# Altium PCB Kasli-DIOT.PCBDOC (part 21 of 23)
Units mm, origin at the board's own origin, x right, y up, seen from the top; angles counter-clockwise.
Board outline 222.9 x 100 mm, 10 copper layers (TopLayer, Layer 2, Layer 3, Layer 4, Layer 5, Layer 6, Layer 7, layer 8, Layer 9, BottomLayer), stack 1.564 mm thick; 977 components, 900 nets, 4676 pads, 2725 vias.
Unrouted connection lines stored in the file: 17.
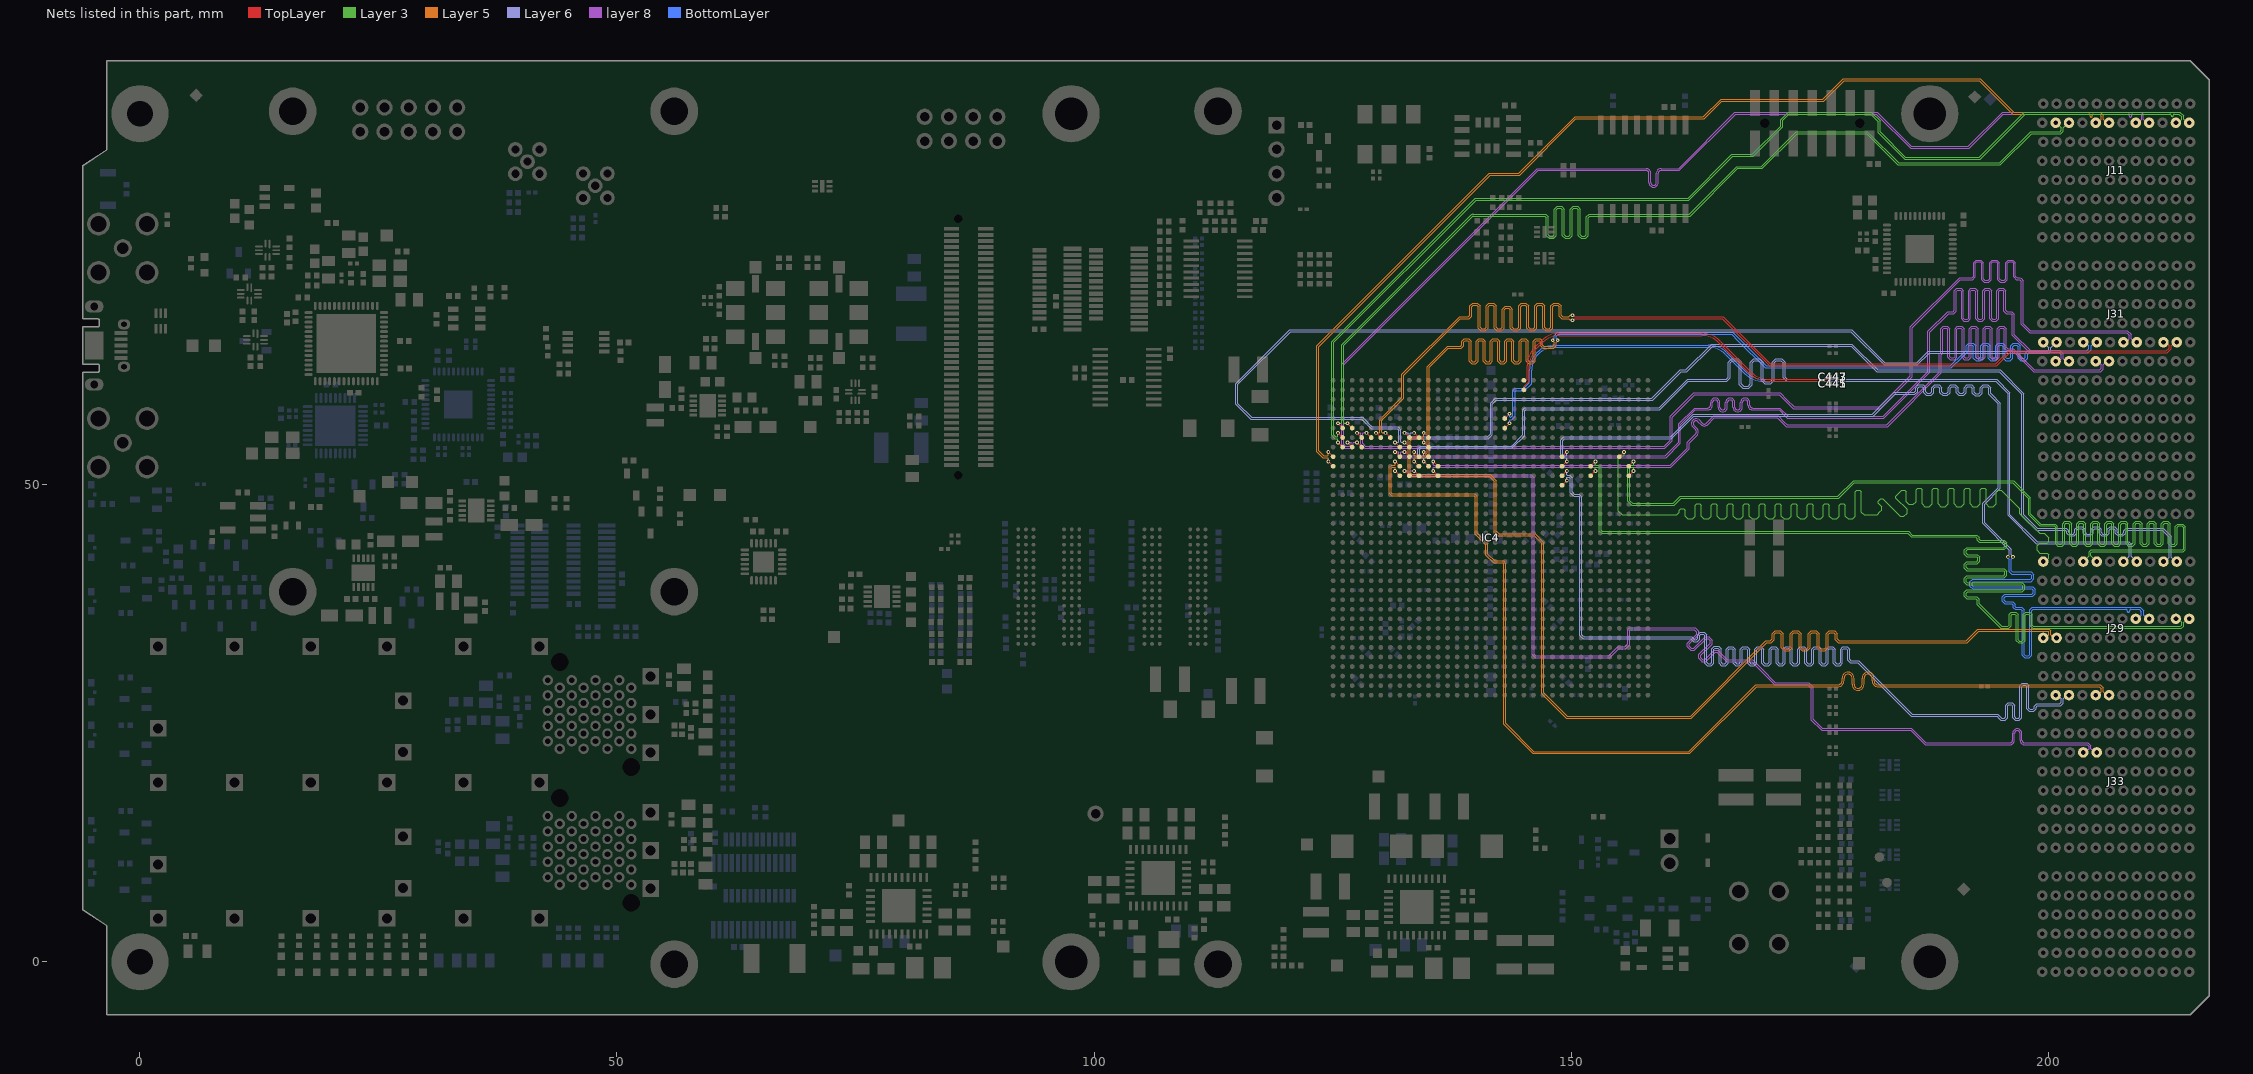
[diagram p27: the nets of this part, all layers, seen from the top]

## Via types
v1: diameter 0.4, hole 0.2, TopLayer to BottomLayer, tented both sides, 1723 vias
v2: diameter 0.5, hole 0.2, TopLayer to BottomLayer, tented both sides, 524 vias
v3: diameter 0.6, hole 0.3, TopLayer to BottomLayer, tented both sides, 172 vias
v4: diameter 0.6, hole 0.3, TopLayer to BottomLayer, 113 vias
v5: diameter 0.5, hole 0.2, TopLayer to BottomLayer, 107 vias
v6: diameter 0.4, hole 0.2, TopLayer to BottomLayer, 67 vias
v7: diameter 0.5, hole 0.25, TopLayer to BottomLayer, tented both sides, 12 vias
v8: diameter 0.8, hole 0.5, TopLayer to BottomLayer, tented both sides, 7 vias

## Nets (pads, with @x,y where several pads share a name; then routed paths per layer and width w, separated by ;. In a path a pad name is that pad's centre, name@x,y a point inside that pad or via, vN(x,y) a via of type N, cw(c..) or ccw(c..) an arc to the next point about the centre after c; other vN are vias at no path point) (continued)
SLOT7.LVDS_1_N: IC4.G11 J29.L4 | length 112.5
  TopLayer w0.095: v1(134.561,55.45) IC4.G11@135.061,54.95
  Layer 5 w0.08: v1(134.561,55.45) 134.561,55.1 134.514,55.054 133.272,55.054 132.928,54.71 132.928,51.19 133.242,50.876 141.435,50.876 141.961,50.35 141.961,45.057 142.368,44.65 146.168,44.65 146.954,43.864 146.954,28.105 149.515,25.543 162.616,25.543 170.523,33.45 170.792,33.45 170.978,33.45 171.285,33.757 171.285,34.316 171.47,34.502 171.841,34.502 172.027,34.316 172.027,32.909 172.333,32.602 172.876,32.602 173.183,32.909 173.183,34.316 173.368,34.502 173.739,34.502 173.925,34.316 173.925,32.909 174.231,32.602 174.774,32.602 175.081,32.909 175.081,34.316 175.266,34.502 175.637,34.502 175.823,34.316 175.823,32.909 176.129,32.602 176.672,32.602 176.979,32.909 176.979,34.316 177.164,34.502 177.535,34.502 177.721,34.316 177.721,33.757 178.027,33.45 178.282,33.45 191.527,33.45 192.727,34.65 200.049,34.65 200.096,34.603 200.096,34.301 199.745,33.95 J29.L4@199.5,33.95
SLOT7.LVDS_1_P: IC4.H11 J29.K4 | length 112.2
  TopLayer w0.095: v1(134.561,54.45) IC4.H11@135.061,53.95
  Layer 5 w0.08: v1(134.561,54.45) 134.561,54.8 134.514,54.847 133.358,54.847 133.135,54.624 133.135,51.276 133.328,51.083 141.521,51.083 142.168,50.436 142.168,45.143 142.454,44.857 146.254,44.857 147.161,43.95 147.161,28.19 149.601,25.75 162.53,25.75 170.437,33.657 170.792,33.657 170.892,33.657 171.078,33.843 171.078,34.402 171.384,34.709 171.927,34.709 172.234,34.402 172.234,32.995 172.419,32.809 172.79,32.809 172.976,32.995 172.976,34.402 173.282,34.709 173.825,34.709 174.132,34.402 174.132,32.995 174.317,32.809 174.688,32.809 174.874,32.995 174.874,34.402 175.18,34.709 175.723,34.709 176.03,34.402 176.03,32.995 176.215,32.809 176.586,32.809 176.772,32.995 176.772,34.402 177.078,34.709 177.621,34.709 177.928,34.402 177.928,33.843 178.113,33.657 178.282,33.657 191.441,33.657 192.641,34.857 200.135,34.857 200.303,34.689 200.303,34.301 200.655,33.95 J29.K4@200.9,33.95
SLOT7.LVDS_2_N: IC4.K8 J29.H1 | length 111.4
  TopLayer w0.095: v1(131.561,52.45) IC4.K8@132.061,51.95
  Layer 5 w0.08: v1(131.561,52.45) 131.561,52.1 131.514,52.054 131.202,52.054 130.973,51.824 130.973,49.096 131.218,48.85 139.817,48.85 139.954,48.713 139.954,44.837 141.079,43.712 141.079,42.632 141.894,41.817 142.84,41.817 142.954,41.703 142.954,24.898 146.014,21.838 162.449,21.838 169.446,28.835 177.845,28.835 177.989,28.835 ccw(c177.989,29.463) 178.617,29.463 178.617,29.722 cw(c179.038,29.722) 179.459,29.722 179.459,29.095 ccw(c180.087,29.095) 180.715,29.095 180.715,29.722 cw(c181.136,29.722) 181.557,29.722 181.557,29.463 ccw(c182.185,29.463) 182.185,28.835 184.616,28.835 205.383,28.835 205.596,28.622 205.596,28.301 205.245,27.95 J29.H1@205,27.95
SLOT7.LVDS_2_P: IC4.L8 J29.G1 | length 111
  TopLayer w0.095: v1(131.561,51.45) IC4.L8@132.061,50.95
  Layer 5 w0.08: v1(131.561,51.45) 131.561,51.8 131.514,51.847 131.288,51.847 131.18,51.739 131.18,49.181 131.304,49.057 139.902,49.057 140.161,48.798 140.161,44.923 141.286,43.798 141.286,42.718 141.98,42.024 142.926,42.024 143.161,41.789 143.161,24.984 146.1,22.045 162.363,22.045 169.36,29.042 177.845,29.042 177.989,29.042 ccw(c177.989,29.463) 178.41,29.463 178.41,29.722 cw(c179.038,29.722) 179.666,29.722 179.666,29.095 ccw(c180.087,29.095) 180.508,29.095 180.508,29.722 cw(c181.136,29.722) 181.764,29.722 181.764,29.463 ccw(c182.185,29.463) 182.185,29.042 184.616,29.042 205.468,29.042 205.803,28.707 205.803,28.301 206.155,27.95 J29.G1@206.4,27.95
SLOT7.LVDS_3_N: IC4.G9 J29.C8 | length 109.6
  TopLayer w0.095: v1(132.561,55.45) IC4.G9@133.061,54.95
  Layer 6 w0.08: v1(132.561,55.45) 132.911,55.45 132.957,55.403 132.957,55.05 133.164,54.843 141.347,54.843 141.768,55.264 141.768,58.464 142.154,58.85 158.561,58.85 161.554,61.843 162.131,61.843 164.831,64.543 179.364,64.543 182.064,61.843 194.894,61.843 197.254,59.483 197.254,46.764 198.785,45.233 201.603,45.233 201.816,45.233 201.976,45.073 201.976,44.916 202.258,44.634 202.751,44.634 203.032,44.916 203.032,45.249 203.193,45.41 203.514,45.41 203.674,45.249 203.674,44.916 203.956,44.634 204.449,44.634 204.73,44.916 204.73,45.249 204.891,45.41 205.212,45.41 205.372,45.249 205.372,44.916 205.654,44.634 206.147,44.634 206.428,44.916 206.428,45.249 206.589,45.41 206.91,45.41 207.07,45.249 207.07,44.916 207.352,44.634 207.845,44.634 208.126,44.916 208.126,45.073 208.287,45.233 208.388,45.233 211.978,45.233 212.696,44.515 212.696,42.554 212.696,42.401 212.245,41.95 J29.C8@212.1,41.95
SLOT7.LVDS_3_P: IC4.G10 J29.B8 | length 109.6
  TopLayer w0.095: v1(133.561,55.45) IC4.G10@134.061,54.95
  Layer 6 w0.08: v1(133.561,55.45) 133.211,55.45 133.164,55.403 133.164,55.136 133.25,55.05 141.261,55.05 141.561,55.35 141.561,58.55 142.068,59.057 158.475,59.057 161.468,62.05 162.045,62.05 164.745,64.75 179.449,64.75 182.149,62.05 194.979,62.05 197.461,59.568 197.461,46.85 198.871,45.44 201.603,45.44 201.902,45.44 202.183,45.159 202.183,45.002 202.344,44.841 202.665,44.841 202.825,45.002 202.825,45.335 203.107,45.617 203.6,45.617 203.881,45.335 203.881,45.002 204.042,44.841 204.363,44.841 204.523,45.002 204.523,45.335 204.805,45.617 205.298,45.617 205.579,45.335 205.579,45.002 205.74,44.841 206.061,44.841 206.221,45.002 206.221,45.335 206.503,45.617 206.996,45.617 207.277,45.335 207.277,45.002 207.438,44.841 207.759,44.841 207.919,45.002 207.919,45.159 208.201,45.44 208.388,45.44 212.063,45.44 212.903,44.6 212.903,42.468 212.903,42.401 213.355,41.95 J29.B8@213.5,41.95
SLOT7.LVDS_4_N: IC4.J11 J29.F8 | length 110.7
  TopLayer w0.095: v1(134.561,53.45) IC4.J11@135.061,52.95
  Layer 6 w0.08: v1(134.561,53.45) 134.561,53.1 134.514,53.054 134.208,53.054 134.161,53.1 134.161,53.703 134.318,53.86 134.761,53.86 134.981,53.86 cw(c134.981,53.77) 135.071,53.77 135.071,53.711 ccw(c135.161,53.711) 135.251,53.711 135.251,53.77 cw(c135.341,53.77) 135.341,53.86 135.6,53.86 143.864,53.86 145.168,55.164 145.168,57.757 145.261,57.85 159.311,57.85 162.304,60.843 166.154,60.843 166.341,60.843 166.697,61.2 166.697,62.77 166.933,63.006 167.404,63.006 167.639,62.77 167.639,60.493 167.996,60.136 168.639,60.136 168.995,60.493 168.995,62.77 169.231,63.006 169.702,63.006 169.937,62.77 169.937,60.947 170.294,60.59 170.937,60.59 171.293,60.947 171.293,62.77 171.529,63.006 172,63.006 172.235,62.77 172.235,61.2 172.592,60.843 172.98,60.843 194.523,60.843 195.805,59.561 195.805,46.799 198.78,43.824 208.387,43.824 208.496,43.715 208.496,42.654 208.496,42.501 207.945,41.95 J29.F8@207.9,41.95
SLOT7.LVDS_4_P: IC4.K11 J29.E8 | length 111.4
  TopLayer w0.095: v1(134.561,52.45) IC4.K11@135.061,51.95
  Layer 6 w0.08: v1(134.561,52.45) 134.561,52.8 134.514,52.847 134.122,52.847 133.954,53.015 133.954,53.789 134.232,54.067 143.778,54.067 144.961,55.25 144.961,57.843 145.175,58.057 159.225,58.057 162.218,61.05 166.154,61.05 166.255,61.05 166.49,61.285 166.49,62.856 166.847,63.213 167.49,63.213 167.846,62.856 167.846,60.579 168.082,60.343 168.553,60.343 168.788,60.579 168.788,62.856 169.145,63.213 169.788,63.213 170.144,62.856 170.144,61.032 170.38,60.797 170.851,60.797 171.086,61.032 171.086,62.856 171.443,63.213 172.086,63.213 172.442,62.856 172.442,61.285 172.678,61.05 172.98,61.05 194.609,61.05 196.012,59.647 196.012,46.885 198.866,44.031 208.473,44.031 208.703,43.8 208.703,42.568 208.703,42.501 209.255,41.95 J29.E8@209.3,41.95
SLOT7.LVDS_5_N: IC4.K12 J31.H1 | length 111.5
  TopLayer w0.095: v1(135.561,52.45) IC4.K12@136.061,51.95
  layer 8 w0.075: v1(135.561,52.45) 135.561,52.095 135.605,52.051 138.748,52.051 160.376,52.051 162.18,53.855 162.18,54.45 162.973,55.243 163.071,55.341 ccw(c162.864,55.547) 163.071,55.753 162.752,56.071 cw(c163.1,56.421) 162.751,56.77 cw(c163.1,56.421) 163.417,56.8 163.42,56.8 163.768,56.451 ccw(c163.975,56.657) 164.181,56.451 164.897,57.167 164.946,57.216 171.717,57.216 172.313,56.62 172.642,56.291 183.1,56.291 188.616,61.807 188.616,63.721 188.736,63.841 188.773,63.878 188.773,66.368 189.026,66.621 189.462,66.621 189.714,66.368 189.714,63.446 189.849,63.312 190.117,63.312 190.251,63.446 190.251,66.368 190.504,66.621 190.94,66.621 191.192,66.368 191.192,63.446 191.327,63.312 191.595,63.312 191.729,63.446 191.729,66.368 191.982,66.621 192.418,66.621 192.67,66.368 192.67,63.446 192.805,63.312 193.073,63.312 193.207,63.446 193.207,66.368 193.46,66.621 193.896,66.621 194.148,66.368 194.148,63.446 194.283,63.312 194.551,63.312 194.685,63.446 194.685,66.368 194.938,66.621 195.374,66.621 195.626,66.368 195.626,64.415 195.761,64.281 196.186,64.281 196.348,64.281 198.579,62.05 205.436,62.05 205.599,62.213 205.599,62.601 205.249,62.95 J31.H1@205,62.95
SLOT7.LVDS_5_P: IC4.L12 J31.G1 | length 111.9
  TopLayer w0.095: v1(135.561,51.45) IC4.L12@136.061,50.95
  layer 8 w0.075: v1(135.561,51.45) 135.561,51.805 135.605,51.849 138.831,51.849 160.46,51.849 162.382,53.771 162.382,54.366 163.115,55.1 163.213,55.198 ccw(c162.864,55.547) 163.213,55.896 162.894,56.215 cw(c163.1,56.421) 162.894,56.627 cw(c163.1,56.421) 163.307,56.627 ; 163.307,56.626 163.625,56.309 ; 163.625,56.308 ccw(c163.975,56.657) 164.324,56.308 165.03,57.014 165.049,57.014 171.633,57.014 172.242,56.405 172.558,56.089 183.184,56.089 188.818,61.723 188.818,63.073 188.818,63.637 188.975,63.795 188.975,66.285 189.11,66.419 189.378,66.419 189.512,66.285 189.512,63.363 189.765,63.11 190.201,63.11 190.453,63.363 190.453,66.285 190.588,66.419 190.856,66.419 190.99,66.285 190.99,63.363 191.243,63.11 191.679,63.11 191.931,63.363 191.931,66.285 192.066,66.419 192.334,66.419 192.468,66.285 192.468,63.363 192.721,63.11 193.157,63.11 193.409,63.363 193.409,66.285 193.544,66.419 193.812,66.419 193.946,66.285 193.946,63.363 194.199,63.11 194.635,63.11 194.887,63.363 194.887,66.285 195.022,66.419 195.29,66.419 195.424,66.285 195.424,64.331 195.677,64.079 196.186,64.079 196.264,64.079 198.495,61.848 205.52,61.848 205.801,62.129 205.801,62.601 206.15,62.95 J31.G1@206.4,62.95
SLOT7.LVDS_6_N: IC4.J8 J31.K1 | length 113.4
  TopLayer w0.095: v1(131.561,53.45) IC4.J8@132.061,52.95
  layer 8 w0.075: v1(131.561,53.45) 131.916,53.45 131.96,53.406 131.96,53.05 132.162,52.848 135.231,52.848 159.957,52.848 161.476,54.366 161.476,56.291 163.032,57.848 164.192,57.848 164.331,57.848 ccw(c164.331,58.342) 164.824,58.342 164.824,58.597 cw(c165.116,58.597) 165.407,58.597 165.407,58.141 ccw(c165.901,58.141) 166.394,58.141 166.394,58.597 cw(c166.686,58.597) 166.977,58.597 166.977,58.141 ccw(c167.471,58.141) 167.964,58.141 167.964,58.597 cw(c168.256,58.597) 168.547,58.597 168.547,58.342 ccw(c169.041,58.342) 169.041,57.848 169.675,57.848 171.805,57.848 172.473,57.18 172.675,56.978 182.805,56.978 187.614,61.787 187.614,65.991 189.573,67.95 189.961,67.95 190.141,67.95 190.394,68.203 190.394,70.267 190.528,70.401 190.797,70.401 190.931,70.267 190.931,67.395 191.184,67.142 191.619,67.142 191.872,67.395 191.872,70.267 192.006,70.401 192.275,70.401 192.409,70.267 192.409,67.395 192.662,67.142 193.097,67.142 193.35,67.395 193.35,70.267 193.484,70.401 193.753,70.401 193.887,70.267 193.887,67.395 194.14,67.142 194.575,67.142 194.828,67.395 194.828,70.267 194.962,70.401 195.231,70.401 195.365,70.267 195.365,68.203 195.618,67.95 196.116,67.95 196.125,67.941 196.25,67.816 196.25,65.661 198.034,63.877 201.159,63.877 201.399,63.637 201.399,63.226 201.355,63.182 201.309,63.182 201.077,62.95 J31.K1@200.8,62.95
SLOT7.LVDS_6_P: IC4.J9 J31.J1 | length 113.4
  TopLayer w0.095: v1(132.561,53.45) IC4.J9@133.061,52.95
  layer 8 w0.075: v1(132.561,53.45) 132.206,53.45 132.162,53.406 132.162,53.133 132.245,53.05 135.315,53.05 159.874,53.05 161.274,54.45 161.274,56.375 162.949,58.05 164.192,58.05 164.331,58.05 ccw(c164.331,58.342) 164.622,58.342 164.622,58.597 cw(c165.116,58.597) 165.609,58.597 165.609,58.141 ccw(c165.901,58.141) 166.192,58.141 166.192,58.597 cw(c166.686,58.597) 167.179,58.597 167.179,58.141 ccw(c167.471,58.141) 167.762,58.141 167.762,58.597 cw(c168.256,58.597) 168.749,58.597 168.749,58.342 ccw(c169.041,58.342) 169.041,58.05 169.675,58.05 171.889,58.05 172.759,57.18 182.721,57.18 187.412,61.871 187.412,66.075 189.489,68.152 189.961,68.152 190.058,68.152 190.192,68.286 190.192,70.351 190.445,70.603 190.88,70.603 191.133,70.351 191.133,67.478 191.267,67.344 191.536,67.344 191.67,67.478 191.67,70.351 191.923,70.603 192.358,70.603 192.611,70.351 192.611,67.478 192.745,67.344 193.014,67.344 193.148,67.478 193.148,70.351 193.401,70.603 193.836,70.603 194.089,70.351 194.089,67.478 194.223,67.344 194.492,67.344 194.626,67.478 194.626,70.351 194.879,70.603 195.314,70.603 195.567,70.351 195.567,68.286 195.701,68.152 196.125,68.152 196.2,68.152 196.452,67.899 196.452,65.744 198.118,64.079 201.243,64.079 201.601,63.721 201.601,63.226 201.645,63.182 201.691,63.182 201.922,62.95 J31.J1@202.2,62.95
SLOT7.LVDS_7_N: IC4.G6 J31.C2 | length 120.9
  TopLayer w0.095: v1(129.561,55.45) IC4.G6@130.061,54.95 ; v1(150.161,67.777) 150.217,67.777 150.369,67.625 165.961,67.625 170.889,62.697 194.533,62.697 195.886,64.05 212.411,64.05 212.689,64.328 212.689,64.593 212.332,64.95 J31.C2@212.1,64.95
  Layer 5 w0.08: v1(129.561,55.45) 129.911,55.45 129.957,55.497 129.957,56.839 132.279,59.161 132.279,61.569 138.327,67.617 139.148,67.617 139.248,67.617 139.409,67.777 139.409,68.744 139.691,69.026 140.183,69.026 140.465,68.744 140.465,66.497 140.625,66.337 140.946,66.337 141.107,66.497 141.107,68.744 141.389,69.026 141.881,69.026 142.163,68.744 142.163,66.497 142.323,66.337 142.644,66.337 142.805,66.497 142.805,68.422 143.087,68.704 143.579,68.704 143.861,68.422 143.861,66.497 144.021,66.337 144.342,66.337 144.503,66.497 144.503,68.744 144.785,69.026 145.277,69.026 145.559,68.744 145.559,66.497 145.719,66.337 146.04,66.337 146.201,66.497 146.201,68.744 146.483,69.026 146.975,69.026 147.257,68.744 147.257,66.497 147.417,66.337 147.738,66.337 147.899,66.497 147.899,68.744 148.181,69.026 148.673,69.026 148.955,68.744 148.955,67.777 149.115,67.617 149.386,67.617 149.764,67.617 149.771,67.624 cw(c150.161,67.25) 150.113,67.788 150.114,67.784 150.12,67.777 v1(150.161,67.777)
SLOT7.LVDS_7_P: IC4.G7 J31.B2 | length 120.9
  TopLayer w0.095: v1(130.561,55.45) IC4.G7@131.061,54.95 ; v1(150.161,67.25) 150.217,67.25 150.369,67.402 165.87,67.402 170.704,62.568 170.797,62.475 194.625,62.475 195.978,63.828 212.503,63.828 212.911,64.236 212.911,64.593 213.268,64.95 J31.B2@213.5,64.95
  Layer 5 w0.08: v1(130.561,55.45) 130.211,55.45 130.164,55.497 130.164,56.753 132.486,59.075 132.486,61.483 138.413,67.41 139.148,67.41 139.334,67.41 139.616,67.692 139.616,68.658 139.776,68.819 140.097,68.819 140.258,68.658 140.258,66.411 140.54,66.13 141.032,66.13 141.314,66.411 141.314,68.658 141.474,68.819 141.795,68.819 141.956,68.658 141.956,66.411 142.238,66.13 142.73,66.13 143.012,66.411 143.012,68.336 143.172,68.497 143.493,68.497 143.654,68.336 143.654,66.411 143.936,66.13 144.428,66.13 144.71,66.411 144.71,68.658 144.87,68.819 145.191,68.819 145.352,68.658 145.352,66.411 145.634,66.13 146.126,66.13 146.408,66.411 146.408,68.658 146.568,68.819 146.889,68.819 147.05,68.658 147.05,66.411 147.332,66.13 147.824,66.13 148.106,66.411 148.106,68.658 148.266,68.819 148.587,68.819 148.748,68.658 148.748,67.692 149.03,67.41 149.386,67.41 149.764,67.41 149.771,67.403 ccw(c150.161,67.777) 150.111,67.239 150.12,67.25 v1(150.161,67.25)
SLOT7.LVDS_8_N: IC4.G4 J31.F2 | length 112.9
  TopLayer w0.095: v1(127.561,55.45) IC4.G4@128.061,54.95
  layer 8 w0.075: v1(127.561,55.45) 127.916,55.45 127.96,55.406 127.96,54.25 128.362,53.848 159.847,53.848 160.605,54.605 160.605,57.096 162.958,59.45 171.823,59.45 172.618,58.655 173.299,57.974 182.401,57.974 185.761,61.334 185.761,66.461 190.807,71.507 191.937,71.507 192.117,71.507 192.395,71.785 192.395,73.201 192.554,73.36 192.872,73.36 193.032,73.201 193.032,71.497 193.309,71.22 193.795,71.22 194.073,71.497 194.073,73.201 194.232,73.36 194.55,73.36 194.71,73.201 194.71,71.497 194.987,71.22 195.473,71.22 195.751,71.497 195.751,73.201 195.91,73.36 196.228,73.36 196.388,73.201 196.388,71.785 196.665,71.507 197.018,71.507 197.18,71.345 197.212,71.314 197.212,66.816 198.077,65.95 208.236,65.95 208.499,65.687 208.499,65.299 208.149,64.95 J31.F2@207.9,64.95
SLOT7.LVDS_8_P: IC4.G5 J31.E2 | length 112.9
  TopLayer w0.095: v1(128.561,55.45) IC4.G5@129.061,54.95
  layer 8 w0.075: v1(128.561,55.45) 128.206,55.45 128.162,55.406 128.162,54.334 128.446,54.05 159.764,54.05 160.403,54.689 160.403,57.18 162.875,59.652 171.906,59.652 172.618,58.94 173.383,58.176 182.317,58.176 185.559,61.417 185.559,66.544 190.724,71.709 191.937,71.709 192.033,71.709 192.193,71.868 192.193,73.285 192.47,73.562 192.956,73.562 193.234,73.285 193.234,71.581 193.393,71.422 193.711,71.422 193.871,71.581 193.871,73.285 194.148,73.562 194.634,73.562 194.912,73.285 194.912,71.581 195.071,71.422 195.389,71.422 195.549,71.581 195.549,73.285 195.826,73.562 196.312,73.562 196.59,73.285 196.59,71.868 196.749,71.709 197.102,71.709 197.18,71.631 197.414,71.397 197.414,66.899 197.691,66.622 198.161,66.152 208.32,66.152 208.701,65.771 208.701,65.299 209.05,64.95 J31.E2@209.3,64.95
SLOT7.LVDS_9_N: IC4.J10 J31.I2 | length 120.2
  TopLayer w0.095: v1(133.561,53.45) IC4.J10@134.061,52.95
  Layer 5 w0.08: v1(133.561,53.45) 133.561,53.1 133.608,53.054 134.645,53.054 134.936,53.344 134.936,62.393 137.065,64.522 138.327,64.522 138.428,64.522 138.563,64.657 138.563,65.073 138.82,65.33 139.262,65.33 139.519,65.073 139.519,63.053 139.655,62.917 139.926,62.917 140.061,63.053 140.061,65.073 140.318,65.33 140.76,65.33 141.017,65.073 141.017,63.053 141.153,62.917 141.424,62.917 141.559,63.053 141.559,65.073 141.816,65.33 142.258,65.33 142.515,65.073 142.515,63.053 142.651,62.917 142.922,62.917 143.057,63.053 143.057,65.073 143.314,65.33 143.756,65.33 144.013,65.073 144.013,63.053 144.149,62.917 144.42,62.917 144.555,63.053 144.555,65.073 144.812,65.33 145.254,65.33 145.511,65.073 145.511,63.053 145.647,62.917 145.918,62.917 146.053,63.053 146.053,65.073 146.31,65.33 146.752,65.33 147.009,65.073 147.009,64.657 147.145,64.522 147.246,64.522 148.108,64.522 148.247,64.66 148.247,64.943 148.087,65.103 v1(148.087,65.15)
  BottomLayer w0.095: v1(148.087,65.15) 148.087,65.198 148.239,65.35 148.239,65.642 148.576,65.979 166.932,65.979 170.439,62.472 189.769,62.472 191.102,63.805 191.404,64.107 191.404,64.589 191.674,64.858 192.136,64.858 192.405,64.589 192.405,63.381 192.545,63.242 192.823,63.242 192.962,63.381 192.962,64.589 193.232,64.858 193.694,64.858 193.963,64.589 193.963,63.381 194.103,63.242 194.381,63.242 194.52,63.381 194.52,64.589 194.79,64.858 195.252,64.858 195.521,64.589 195.521,63.381 195.661,63.242 195.939,63.242 196.078,63.381 196.078,64.589 196.348,64.858 196.81,64.858 197.079,64.589 197.079,63.381 197.219,63.242 197.497,63.242 197.636,63.381 197.636,63.781 197.906,64.05 198.11,64.05 204.072,64.05 204.289,64.266 204.289,64.593 203.932,64.95 J31.I2@203.7,64.95
SLOT7.LVDS_9_P: IC4.K10 J31.H2 | length 120.6
  TopLayer w0.095: v1(133.561,52.45) IC4.K10@134.061,51.95
  Layer 5 w0.08: v1(133.561,52.45) 133.561,52.8 133.608,52.847 134.731,52.847 135.143,53.258 135.143,62.307 137.151,64.315 138.327,64.315 138.513,64.315 138.77,64.572 138.77,64.988 138.906,65.123 139.177,65.123 139.312,64.988 139.312,62.967 139.569,62.71 140.011,62.71 140.268,62.967 140.268,64.988 140.404,65.123 140.675,65.123 140.81,64.988 140.81,62.967 141.067,62.71 141.509,62.71 141.766,62.967 141.766,64.988 141.902,65.123 142.173,65.123 142.308,64.988 142.308,62.967 142.565,62.71 143.007,62.71 143.264,62.967 143.264,64.988 143.4,65.123 143.671,65.123 143.806,64.988 143.806,62.967 144.063,62.71 144.505,62.71 144.762,62.967 144.762,64.988 144.898,65.123 145.169,65.123 145.304,64.988 145.304,62.967 145.561,62.71 146.003,62.71 146.26,62.967 146.26,64.988 146.396,65.123 146.667,65.123 146.802,64.988 146.802,64.572 147.059,64.315 147.246,64.315 148.194,64.315 148.454,64.574 148.454,64.943 148.614,65.103 v1(148.614,65.15)
  BottomLayer w0.095: v1(148.614,65.15) 148.614,65.198 148.461,65.35 148.461,65.55 148.668,65.757 166.84,65.757 167.5,65.097 170.282,62.315 170.347,62.25 189.861,62.25 191.102,63.491 191.626,64.015 191.626,64.497 191.766,64.636 192.044,64.636 192.183,64.497 192.183,63.289 192.453,63.02 192.915,63.02 193.184,63.289 193.184,64.497 193.324,64.636 193.602,64.636 193.741,64.497 193.741,63.289 194.011,63.02 194.473,63.02 194.742,63.289 194.742,64.497 194.882,64.636 195.16,64.636 195.299,64.497 195.299,63.289 195.569,63.02 196.031,63.02 196.3,63.289 196.3,64.497 196.44,64.636 196.718,64.636 196.857,64.497 196.857,63.289 197.127,63.02 197.589,63.02 197.858,63.289 197.858,63.689 197.998,63.828 198.11,63.828 204.164,63.828 204.511,64.174 204.511,64.593 204.868,64.95 J31.H2@205.1,64.95
SLOT7.LVDS_10_N: IC4.H8 J31.L2 | length 113.4
  TopLayer w0.095: v1(131.561,54.45) IC4.H8@132.061,53.95
  Layer 6 w0.08: v1(131.561,54.45) 131.911,54.45 131.957,54.497 131.957,55.695 131.786,55.867 129.043,55.867 128.06,56.85 116.435,56.85 114.865,58.419 114.865,60.606 120.517,66.257 179.417,66.257 182.904,62.77 186.224,62.77 187.461,64.007 200.011,64.007 200.096,64.093 200.096,64.354 J31.L2@199.5,64.95
SLOT7.LVDS_10_P: IC4.H9 J31.K2 | length 113.4
  TopLayer w0.095: v1(132.561,54.45) IC4.H9@133.061,53.95
  Layer 6 w0.08: v1(132.561,54.45) 132.211,54.45 132.164,54.497 132.164,55.781 131.872,56.074 129.129,56.074 128.146,57.057 116.52,57.057 115.072,58.505 115.072,60.52 120.602,66.05 179.331,66.05 182.818,62.563 186.31,62.563 187.547,63.8 200.096,63.8 200.303,64.007 200.303,64.354 J31.K2@200.9,64.95
SLOT7.LVDS_11_N: IC4.G2 J11.B7 | length 116.4
  TopLayer w0.095: v1(125.561,55.45) IC4.G2@126.061,54.95
  Layer 3 w0.075: v1(125.561,55.45) 125.561,55.095 125.517,55.051 125.333,55.051 125.127,55.257 125.127,64.931 140.045,79.848 162.359,79.848 166.945,84.434 169.089,84.434 172.179,87.524 172.179,88.193 172.836,88.85 181.405,88.85 182.199,88.056 182.199,86.908 182.258,86.849 184.912,84.195 184.971,84.136 192.894,84.136 197.609,88.85 212.448,88.85 212.778,88.85 cw(c212.778,88.737) 212.89,88.747 212.894,88.705 ccw(c213.006,88.715) 213.015,88.603 ccw(c213.006,88.715) 213.118,88.725 213.117,88.728 cw(c213.23,88.737) 213.23,88.85 213.5,88.85 213.502,88.85 213.726,88.85 213.999,88.577 213.999,88.311 213.638,87.95 J11.B7@213.4,87.95
SLOT7.LVDS_11_P: IC4.H2 J11.A7 | length 117.2
  TopLayer w0.095: v1(125.561,54.45) IC4.H2@126.061,53.95
  Layer 3 w0.075: v1(125.561,54.45) 125.561,54.805 125.517,54.849 125.25,54.849 124.925,55.173 124.925,65.014 139.961,80.05 162.275,80.05 166.861,84.636 169.005,84.636 171.977,87.608 171.977,88.277 172.752,89.052 172.902,89.052 181.488,89.052 182.401,88.139 182.401,86.992 185.055,84.338 192.811,84.338 197.525,89.052 197.609,89.052 213.809,89.052 214.201,88.661 214.201,88.311 214.562,87.95 J11.A7@214.8,87.95
SLOT7.LVDS_12_N: IC4.H3 J11.E7 | length 112.5
  TopLayer w0.095: v1(126.561,54.45) IC4.H3@127.061,53.95
  layer 8 w0.075: v1(126.561,54.45) 126.916,54.45 126.96,54.406 126.96,54.199 126.811,54.05 126.361,54.05 126.261,54.15 126.161,54.25 126.161,62.565 146.544,82.948 153.754,82.948 157.873,82.948 cw(c157.873,82.656) 158.165,82.656 158.165,81.692 ccw(c158.658,81.692) 159.152,81.692 159.152,82.656 cw(c159.443,82.656) 159.443,82.948 159.582,82.948 161.354,82.948 161.473,83.066 167.256,88.85 182.019,88.85 185.602,85.267 191.736,85.267 191.795,85.326 195.319,88.85 208.132,88.85 208.406,88.85 cw(c208.406,88.731) 208.525,88.731 208.525,88.661 ccw(c208.643,88.661) 208.762,88.661 208.762,88.731 cw(c208.88,88.731) 208.88,88.85 209.2,88.85 209.699,88.85 209.799,88.75 209.799,88.311 209.438,87.95 J11.E7@209.2,87.95
SLOT7.LVDS_12_P: IC4.H4 J11.D7 | length 113.5
  TopLayer w0.095: v1(127.561,54.45) IC4.H4@128.061,53.95
  layer 8 w0.075: v1(127.561,54.45) 127.206,54.45 127.162,54.406 127.162,54.065 126.945,53.848 126.277,53.848 126.159,53.966 125.959,54.166 125.959,62.648 146.461,83.15 153.754,83.15 157.873,83.15 cw(c157.873,82.656) 158.367,82.656 158.367,81.692 ccw(c158.658,81.692) 158.95,81.692 158.95,82.656 cw(c159.443,82.656) 159.443,83.15 159.582,83.15 161.271,83.15 167.173,89.052 182.103,89.052 185.686,85.469 191.652,85.469 195.235,89.052 209.782,89.052 210.001,88.834 210.001,88.311 210.362,87.95 J11.D7@210.6,87.95
SLOT7.LVDS_13_N: IC4.J1 J11.H7 | length 109.8
  TopLayer w0.095: v1(124.561,53.45) IC4.J1@125.061,52.95
  Layer 5 w0.08: v1(124.561,53.45) 124.561,53.104 124.514,53.057 124.059,53.057 123.561,53.555 123.561,64.494 141.511,82.444 144.605,82.444 150.511,88.35 163.961,88.35 165.81,90.199 176.467,90.199 178.619,92.351 192.806,92.351 196.307,88.85 204.016,88.85 204.056,88.85 204.286,88.85 cw(c204.286,88.735) 204.401,88.735 204.401,88.657 ccw(c204.516,88.657) 204.516,88.542 ccw(c204.516,88.657) 204.631,88.657 204.631,88.735 cw(c204.746,88.735) 204.746,88.85 205.045,88.85 205.085,88.85 205.397,88.85 205.596,88.65 205.596,88.454 205.596,88.301 205.245,87.95 J11.H7@205,87.95
SLOT7.LVDS_13_P: IC4.K1 J11.G7 | length 110.5
  TopLayer w0.095: v1(124.561,52.45) IC4.K1@125.061,51.95
  Layer 5 w0.08: v1(124.561,52.45) 124.561,52.803 124.514,52.85 123.973,52.85 123.354,53.469 123.354,64.58 141.425,82.651 144.519,82.651 150.425,88.557 163.875,88.557 165.724,90.406 176.381,90.406 178.533,92.558 192.892,92.558 196.393,89.057 204.016,89.057 205.482,89.057 205.803,88.736 205.803,88.368 205.803,88.301 206.155,87.95 J11.G7@206.4,87.95
SLOT7.LVDS_14_N: IC4.F2 J11.K7 | length 113.7
  TopLayer w0.095: v1(125.561,56.45) IC4.F2@126.061,55.95
  Layer 3 w0.075: v1(125.561,56.45) 125.916,56.45 125.96,56.494 125.96,56.849 125.96,64.693 139.504,78.237 ; 139.505,78.237 139.564,78.297 cw(c139.759,78.1) 139.759,78.377 147.245,78.377 ; 147.161,78.377 147.245,78.377 ; J11.K7@200.8,87.95 200.901,87.95 201.399,87.452 201.399,87.162 201.26,87.023 198.19,87.023 194.918,83.751 184.328,83.751 181.175,86.905 181.056,87.023 173.616,87.023 169.951,83.358 167.383,83.358 162.402,78.377 152.08,78.377 151.899,78.377 151.622,78.099 151.622,76.198 151.462,76.038 151.144,76.038 150.985,76.198 150.985,78.907 150.707,79.185 150.221,79.185 149.944,78.907 149.944,76.198 149.784,76.038 149.466,76.038 149.307,76.198 149.307,78.907 149.029,79.185 148.543,79.185 148.266,78.907 148.266,76.198 148.106,76.038 147.788,76.038 147.629,76.198 147.629,78.099 147.351,78.377 147.245,78.377
SLOT7.LVDS_14_P: IC4.F3 J11.J7 | length 113.6
  TopLayer w0.095: v1(126.561,56.45) IC4.F3@127.061,55.95
  Layer 3 w0.075: v1(126.561,56.45) 126.206,56.45 126.162,56.494 126.162,56.765 126.162,64.609 139.647,78.094 ; 139.647,78.094 139.706,78.153 cw(c139.759,78.1) 139.759,78.175 147.161,78.175 147.267,78.175 147.427,78.016 147.427,76.114 147.704,75.836 148.19,75.836 148.468,76.114 148.468,78.824 148.627,78.983 148.945,78.983 149.105,78.824 149.105,76.114 149.382,75.836 149.868,75.836 150.146,76.114 150.146,78.824 150.305,78.983 150.623,78.983 150.783,78.824 150.783,76.114 151.06,75.836 151.546,75.836 151.824,76.114 151.824,78.016 151.983,78.175 152.08,78.175 162.486,78.175 167.467,83.156 170.035,83.156 173.7,86.821 180.973,86.821 184.244,83.549 195.002,83.549 198.274,86.821 201.344,86.821 201.601,87.078 201.601,87.452 202.099,87.95 J11.J7@202.2,87.95
SLOT7.LVDS_15_N: IC4.L9 J33.I6 | length 110.9
  TopLayer w0.095: v1(132.561,51.45) IC4.L9@133.061,50.95
  layer 8 w0.075: v1(132.561,51.45) 132.916,51.45 132.96,51.406 132.96,51.05 133.16,50.85 145.759,50.85 145.959,50.65 145.959,32.166 146.118,32.007 146.242,31.883 154.06,31.883 154.991,32.814 155.727,32.814 156.161,33.249 156.161,34.75 156.239,34.828 162.738,34.828 162.931,34.828 163.085,34.675 163.155,34.605 163.181,34.579 163.178,34.355 162.235,33.43 162.205,33.4 162.202,33.049 162.202,33.008 162.513,32.691 162.542,32.661 162.893,32.658 162.935,32.658 164.171,33.87 164.396,33.868 164.619,33.641 164.617,33.415 163.41,32.232 163.38,32.202 163.377,31.851 163.377,31.81 163.688,31.493 163.717,31.463 164.068,31.46 164.11,31.46 165.103,32.434 165.328,32.431 165.397,32.363 166.316,31.444 168.955,31.444 169.697,30.702 171.349,29.05 174.824,29.05 175.202,28.673 175.202,25.331 176.163,24.37 176.267,24.266 185.598,24.266 186.498,23.365 187.113,22.75 195.852,22.75 195.991,22.75 ccw(c195.991,23.244) 196.484,23.244 196.484,23.935 cw(c196.776,23.935) 197.067,23.935 197.067,23.244 ccw(c197.561,23.244) 197.561,22.75 198.909,22.75 204.09,22.75 204.299,22.542 204.299,22.311 203.938,21.95 J33.I6@203.7,21.95
SLOT7.LVDS_15_P: IC4.L10 J33.H6 | length 110.9
  TopLayer w0.095: v1(133.561,51.45) IC4.L10@134.061,50.95
  layer 8 w0.075: v1(133.561,51.45) 133.206,51.45 133.162,51.406 133.162,51.134 133.244,51.052 145.843,51.052 146.161,50.734 146.161,32.25 146.326,32.085 153.977,32.085 154.908,33.016 155.643,33.016 155.959,33.333 155.959,34.834 156.156,35.03 162.944,35.03 163.015,35.03 163.048,34.998 163.239,34.807 163.335,34.71 163.383,34.663 163.383,34.62 163.38,34.27 163.35,34.24 162.407,33.315 162.404,33.09 162.627,32.862 162.853,32.86 164.089,34.073 164.131,34.073 164.481,34.069 164.511,34.04 164.822,33.723 164.822,33.681 164.818,33.33 164.789,33.301 163.581,32.117 163.579,31.892 163.802,31.664 164.027,31.662 165.021,32.636 165.062,32.636 165.402,32.633 165.435,32.61 165.472,32.574 165.541,32.505 166.4,31.646 169.039,31.646 169.983,30.702 171.433,29.252 174.908,29.252 175.404,28.756 175.404,25.415 176.351,24.468 185.681,24.468 186.498,23.651 187.197,22.952 195.852,22.952 195.991,22.952 ccw(c195.991,23.244) 196.282,23.244 196.282,23.935 cw(c196.776,23.935) 197.269,23.935 197.269,23.244 ccw(c197.561,23.244) 197.561,22.952 198.909,22.952 204.174,22.952 204.501,22.625 204.501,22.311 204.862,21.95 J33.H6@205.1,21.95
SLOT7_MGT.MGT_Rx_N: C447.2 IC4.E19 | length 41.8
  TopLayer w0.095: IC4.E19@143.061,56.95 v1(143.561,57.45)
  BottomLayer w0.095: v1(143.561,57.45) 143.561,57.117 143.617,57.061 143.695,57.061 143.909,57.274 143.909,59.84 144.171,60.103 145.031,60.103 145.639,60.71 145.639,62 cw(c148.241,62) 145.639,62.004 cw(c148.241,62) 146.399,63.838 cw(c148.241,62) 146.401,63.84 146.403,63.842 cw(c148.354,61.891) 146.405,63.844 cw(c148.354,61.891) 148.354,64.65 164.394,64.65 cw(c164.394,61.894) 166.343,63.843 168.369,61.817 ccw(c170.165,63.614) 170.165,61.074 176.796,61.074 ccw(c176.796,61.211) 176.893,61.114 ccw(c176.856,61.151) 176.909,61.151 cw(c176.961,61.151) 176.924,61.188 177.043,61.307 cw(c177.086,61.265) C447.2@177.086,61.325
SLOT7_MGT.MGT_Rx_P: C445.2 IC4.F19 | length 41.8
  TopLayer w0.095: IC4.F19@143.061,55.95 v1(143.561,56.45)
  BottomLayer w0.095: v1(143.561,56.45) 143.561,56.783 143.617,56.839 143.787,56.839 144.131,57.182 144.131,59.748 144.263,59.88 145.123,59.88 145.861,60.618 145.861,61.999 cw(c148.244,61.999) 146.558,63.683 cw(c148.244,61.999) 146.559,63.684 cw(c148.355,61.888) 148.355,64.428 164.392,64.428 cw(c164.392,61.888) 166.188,63.684 168.212,61.66 ccw(c170.164,63.612) 170.164,60.852 176.796,60.852 cw(c176.796,60.714) 176.893,60.811 cw(c176.856,60.774) 176.909,60.774 ccw(c176.961,60.774) 176.924,60.737 177.043,60.618 ccw(c177.086,60.66) C445.2@177.086,60.6
SLOT7_MGT.MGT_Tx_N: C443.1 IC4.A21 | length 37.2
  TopLayer w0.095: IC4.A21@145.061,60.95 145.128,61.017 145.359,61.017 145.414,61.073 145.414,62.461 cw(c148.174,62.461) 145.414,62.464 cw(c148.174,62.461) 146.221,64.41 cw(c148.174,62.461) 146.223,64.412 146.968,65.157 cw(c148.694,63.431) 148.694,65.872 163.697,65.872 cw(c163.697,63.116) 165.646,65.065 168.894,61.817 ccw(c170.69,63.614) 170.69,61.074 176.796,61.074 ccw(c176.796,61.211) 176.893,61.114 ccw(c176.856,61.151) 176.909,61.151 cw(c176.961,61.151) 176.924,61.188 177.043,61.307 cw(c177.086,61.265) C443.1@177.086,61.325
SLOT7_MGT.MGT_Tx_P: C441.1 IC4.B21 | length 37.8
  TopLayer w0.095: IC4.B21@145.061,59.95 145.093,59.982 145.093,60.327 145.637,60.871 145.637,62.459 cw(c148.177,62.459) 146.38,64.255 147.06,64.935 cw(c148.786,63.209) 148.786,65.65 163.695,65.65 cw(c163.695,63.11) 165.491,64.906 168.737,61.66 ccw(c170.689,63.612) 168.74,61.657 ccw(c170.689,63.612) 170.689,60.852 176.796,60.852 cw(c176.796,60.714) 176.893,60.811 cw(c176.856,60.774) 176.909,60.774 ccw(c176.961,60.774) 176.924,60.737 177.043,60.618 ccw(c177.086,60.66) C441.1@177.086,60.6
SLOT8.LVDS_0_N: IC4.K28 J29.B5 | length 116.8
  TopLayer w0.095: IC4.K28@152.061,51.95 v1(152.561,52.45)
  Layer 3 w0.075: v1(152.561,52.45) 152.561,52.095 152.605,52.051 152.922,52.051 153.161,51.812 153.161,45.231 153.279,45.113 185.398,45.113 185.773,44.738 192.513,44.738 192.765,44.487 192.765,44.475 192.765,44.298 192.899,44.164 195.433,44.164 195.685,43.911 195.685,43.475 195.433,43.223 191.567,43.223 191.433,43.088 191.433,42.82 191.567,42.686 192.605,42.686 192.857,42.433 192.857,41.997 192.605,41.745 191.567,41.745 191.433,41.61 191.433,41.342 191.567,41.208 195.433,41.208 195.685,40.955 195.685,40.519 195.433,40.267 191.567,40.267 191.433,40.132 191.433,39.864 191.567,39.73 197.293,39.73 197.545,39.477 197.545,39.041 197.293,38.789 191.567,38.789 191.433,38.654 191.433,38.386 191.567,38.252 192.512,38.252 192.765,37.999 192.765,37.819 192.765,37.525 195.139,35.15 195.686,35.15 195.783,35.15 195.917,35.284 195.917,36.406 196.17,36.659 196.606,36.659 196.858,36.406 196.858,33.761 196.993,33.627 197.261,33.627 197.395,33.761 197.395,36.406 197.648,36.659 198.084,36.659 198.336,36.406 198.336,35.284 198.471,35.15 198.836,35.15 213.884,35.15 213.999,35.265 213.999,35.589 213.638,35.95 J29.B5@213.4,35.95
SLOT8.LVDS_0_P: IC4.L28 J29.A5 | length 117.1
  TopLayer w0.095: IC4.L28@152.061,50.95 v1(152.561,51.45)
  Layer 3 w0.075: v1(152.561,51.45) 152.561,51.805 152.605,51.849 152.838,51.849 152.959,51.728 152.959,45.147 153.196,44.911 185.315,44.911 185.689,44.536 192.429,44.536 192.491,44.475 192.563,44.403 192.563,44.214 192.815,43.962 195.349,43.962 195.483,43.827 195.483,43.559 195.349,43.425 191.484,43.425 191.231,43.172 191.231,42.736 191.484,42.484 192.521,42.484 192.655,42.349 192.655,42.081 192.521,41.947 191.484,41.947 191.231,41.694 191.231,41.258 191.484,41.006 195.349,41.006 195.483,40.871 195.483,40.603 195.349,40.469 191.484,40.469 191.231,40.216 191.231,39.78 191.484,39.528 197.209,39.528 197.343,39.393 197.343,39.125 197.209,38.991 191.484,38.991 191.231,38.738 191.231,38.302 191.484,38.05 192.428,38.05 192.563,37.915 192.563,37.819 192.563,37.441 195.055,34.948 195.686,34.948 195.867,34.948 196.119,35.201 196.119,36.322 196.254,36.457 196.522,36.457 196.656,36.322 196.656,33.678 196.909,33.425 197.345,33.425 197.597,33.678 197.597,36.322 197.732,36.457 198,36.457 198.134,36.322 198.134,35.201 198.387,34.948 198.836,34.948 213.968,34.948 214.201,35.181 214.201,35.589 214.562,35.95 J29.A5@214.8,35.95
SLOT8.LVDS_1_N: IC4.J25 J29.E5 | length 124.1
  TopLayer w0.095: IC4.J25@149.061,52.95 v1(149.561,53.45)
  Layer 6 w0.08: v1(149.561,53.45) 149.561,53.1 149.514,53.054 149.229,53.054 149.135,53.147 149.135,54.624 149.328,54.817 160.518,54.817 162.876,57.175 181.668,57.175 183.976,59.483 185.862,59.483 186.049,59.483 186.33,59.764 186.33,60.096 186.491,60.256 186.812,60.256 186.972,60.096 186.972,59.666 187.254,59.384 187.747,59.384 188.028,59.666 188.028,60.096 188.189,60.256 188.51,60.256 188.67,60.096 188.67,59.666 188.952,59.384 189.445,59.384 189.726,59.666 189.726,60.096 189.887,60.256 190.208,60.256 190.368,60.096 190.368,59.666 190.65,59.384 191.143,59.384 191.424,59.666 191.424,60.096 191.585,60.256 191.906,60.256 192.066,60.096 192.066,59.604 192.348,59.322 192.841,59.322 193.122,59.604 193.122,60.096 193.283,60.256 193.604,60.256 193.764,60.096 193.764,59.504 194.043,59.225 194.789,58.48 194.789,49.71 193.152,48.073 193.152,45.959 195.947,43.165 195.947,42.657 195.787,42.497 v1(195.787,42.45)
  BottomLayer w0.095: v1(195.787,42.45) 195.787,42.367 195.939,42.215 195.939,41.489 195.939,40.909 196.208,40.64 198.141,40.64 198.28,40.5 198.28,40.222 198.141,40.083 192.086,40.083 191.817,39.813 191.817,39.351 192.086,39.082 198.287,39.082 198.426,38.942 198.426,38.664 198.287,38.525 195.478,38.525 195.208,38.255 195.208,37.793 195.478,37.524 196.221,37.524 196.268,37.476 196.36,37.384 196.36,37.136 196.546,36.95 196.97,36.95 197.163,36.95 197.303,36.811 197.303,32.119 197.572,31.85 198.034,31.85 198.304,32.119 198.304,36.811 198.443,36.95 198.555,36.95 207.861,36.95 208.166,36.95 cw(c208.166,36.822) 208.294,36.822 208.294,36.771 ccw(c208.423,36.771) 208.551,36.771 208.551,36.822 cw(c208.68,36.822) 208.68,36.95 208.886,36.95 209.549,36.95 209.789,36.71 209.789,36.307 209.432,35.95 J29.E5@209.2,35.95
SLOT8.LVDS_1_P: IC4.K25 J29.D5 | length 124.7
  TopLayer w0.095: IC4.K25@149.061,51.95 v1(149.561,52.45)
  Layer 6 w0.08: v1(149.561,52.45) 149.561,52.8 149.514,52.847 149.143,52.847 148.928,53.061 148.928,54.71 149.242,55.024 160.432,55.024 162.79,57.382 181.582,57.382 183.89,59.69 185.862,59.69 185.963,59.69 186.123,59.85 186.123,60.181 186.405,60.463 186.898,60.463 187.179,60.181 187.179,59.752 187.34,59.591 187.661,59.591 187.821,59.752 187.821,60.181 188.103,60.463 188.596,60.463 188.877,60.181 188.877,59.752 189.038,59.591 189.359,59.591 189.519,59.752 189.519,60.181 189.801,60.463 190.294,60.463 190.575,60.181 190.575,59.752 190.736,59.591 191.057,59.591 191.217,59.752 191.217,60.181 191.499,60.463 191.992,60.463 192.273,60.181 192.273,59.69 192.434,59.529 192.755,59.529 192.915,59.69 192.915,60.181 193.197,60.463 193.69,60.463 193.971,60.181 193.971,59.59 194.043,59.518 194.996,58.565 194.996,49.625 193.359,47.988 193.359,46.045 196.154,43.25 196.154,42.657 196.314,42.497 v1(196.314,42.45)
  BottomLayer w0.095: v1(196.314,42.45) 196.314,42.367 196.161,42.215 196.161,41.489 196.161,41.001 196.3,40.862 198.233,40.862 198.502,40.592 198.502,40.13 198.233,39.861 192.178,39.861 192.039,39.721 192.039,39.443 192.178,39.304 198.379,39.304 198.648,39.034 198.648,38.572 198.379,38.303 195.57,38.303 195.431,38.163 195.431,37.885 195.57,37.746 196.312,37.746 196.582,37.476 196.582,37.228 196.638,37.172 196.97,37.172 197.255,37.172 197.525,36.903 197.525,32.211 197.664,32.072 197.942,32.072 198.082,32.211 198.082,36.903 198.351,37.172 198.555,37.172 209.641,37.172 210.011,36.802 210.011,36.307 210.368,35.95 J29.D5@210.6,35.95
SLOT8.LVDS_2_N: IC4.L25 J29.K1 | length 117
  TopLayer w0.095: IC4.L25@149.061,50.95 v1(149.561,51.45)
  Layer 6 w0.08: v1(149.561,51.45) 149.561,51.071 149.608,51.024 149.876,51.024 150.135,50.765 150.135,49.252 150.363,49.024 150.88,49.024 151.135,48.769 151.135,34.276 151.361,34.05 162.654,34.05 162.754,33.949 162.941,33.763 163.132,33.763 163.268,33.898 163.268,34.295 163.525,34.552 163.967,34.552 164.224,34.295 164.224,31.379 164.359,31.244 164.63,31.244 164.766,31.379 164.766,32.825 165.023,33.082 165.465,33.082 165.722,32.825 165.722,31.379 165.857,31.244 166.128,31.244 166.264,31.379 166.264,32.785 166.521,33.042 166.963,33.042 167.22,32.785 167.22,31.379 167.355,31.244 167.626,31.244 167.762,31.379 167.762,32.785 168.019,33.042 168.461,33.042 168.718,32.785 168.718,31.379 168.853,31.244 169.124,31.244 169.26,31.379 169.26,32.785 169.517,33.042 169.959,33.042 170.216,32.785 170.216,31.379 170.351,31.244 170.622,31.244 170.758,31.379 170.758,32.785 171.015,33.042 171.457,33.042 171.714,32.785 171.714,31.379 171.849,31.244 172.12,31.244 172.256,31.379 172.256,32.785 172.513,33.042 172.955,33.042 173.212,32.785 173.212,31.379 173.347,31.244 173.618,31.244 173.754,31.379 173.754,32.785 174.011,33.042 174.453,33.042 174.71,32.785 174.71,31.379 174.845,31.244 175.116,31.244 175.252,31.379 175.252,32.785 175.509,33.042 175.951,33.042 176.208,32.785 176.208,31.379 176.343,31.244 176.614,31.244 176.75,31.379 176.75,32.785 177.007,33.042 177.449,33.042 177.706,32.785 177.706,31.379 177.841,31.244 178.112,31.244 178.248,31.379 178.248,32.785 178.505,33.042 178.947,33.042 179.204,32.785 179.204,31.7 179.339,31.564 179.925,31.564 180.139,31.564 185.754,25.95 193.814,25.95 194.75,25.95 195.006,25.693 195.006,25.672 195.142,25.537 195.413,25.537 195.548,25.672 195.548,26.901 195.805,27.158 196.248,27.158 196.504,26.901 196.504,25.672 196.64,25.537 196.911,25.537 197.046,25.672 197.046,28.924 197.303,29.181 197.746,29.181 198.002,28.924 198.002,26.601 198.138,26.465 198.409,26.465 198.544,26.601 198.544,26.793 198.801,27.05 199.081,27.05 201.242,27.05 201.396,27.204 201.396,27.599 201.045,27.95 J29.K1@200.8,27.95
SLOT8.LVDS_2_P: IC4.M25 J29.J1 | length 117.3
  TopLayer w0.095: IC4.M25@149.061,49.95 v1(149.561,50.45)
  Layer 6 w0.08: v1(149.561,50.45) 149.561,50.77 149.608,50.817 149.79,50.817 149.928,50.679 149.928,49.166 150.277,48.817 150.794,48.817 150.928,48.683 150.928,34.19 151.275,33.843 162.568,33.843 162.754,33.657 162.855,33.556 163.218,33.556 163.475,33.813 163.475,34.209 163.61,34.345 163.881,34.345 164.017,34.209 164.017,31.294 164.274,31.037 164.716,31.037 164.973,31.294 164.973,32.74 165.108,32.875 165.379,32.875 165.515,32.74 165.515,31.294 165.772,31.037 166.214,31.037 166.471,31.294 166.471,32.7 166.606,32.835 166.877,32.835 167.013,32.7 167.013,31.294 167.27,31.037 167.712,31.037 167.969,31.294 167.969,32.7 168.104,32.835 168.375,32.835 168.511,32.7 168.511,31.294 168.768,31.037 169.21,31.037 169.467,31.294 169.467,32.7 169.602,32.835 169.873,32.835 170.009,32.7 170.009,31.294 170.266,31.037 170.708,31.037 170.965,31.294 170.965,32.7 171.1,32.835 171.371,32.835 171.507,32.7 171.507,31.294 171.764,31.037 172.206,31.037 172.463,31.294 172.463,32.7 172.598,32.835 172.869,32.835 173.005,32.7 173.005,31.294 173.262,31.037 173.704,31.037 173.961,31.294 173.961,32.7 174.096,32.835 174.367,32.835 174.503,32.7 174.503,31.294 174.76,31.037 175.202,31.037 175.459,31.294 175.459,32.7 175.594,32.835 175.865,32.835 176.001,32.7 176.001,31.294 176.258,31.037 176.7,31.037 176.957,31.294 176.957,32.7 177.092,32.835 177.363,32.835 177.499,32.7 177.499,31.294 177.756,31.037 178.198,31.037 178.455,31.294 178.455,32.7 178.59,32.835 178.861,32.835 178.997,32.7 178.997,31.614 179.254,31.357 179.925,31.357 180.054,31.357 185.668,25.743 193.814,25.743 194.664,25.743 194.799,25.608 194.799,25.587 195.056,25.33 195.499,25.33 195.755,25.587 195.755,26.815 195.891,26.951 196.162,26.951 196.297,26.815 196.297,25.587 196.554,25.33 196.997,25.33 197.253,25.587 197.253,28.838 197.389,28.974 197.66,28.974 197.795,28.838 197.795,26.515 198.052,26.258 198.495,26.258 198.751,26.515 198.751,26.708 198.887,26.843 199.081,26.843 201.328,26.843 201.603,27.118 201.603,27.599 201.955,27.95 J29.J1@202.2,27.95
SLOT8.LVDS_3_N: IC4.K32 J29.I8 | length 119.4
  TopLayer w0.095: IC4.K32@156.061,51.95 v1(156.561,52.45)
  Layer 3 w0.075: v1(156.561,52.45) 156.561,52.095 156.517,52.051 156.173,52.051 155.959,51.837 155.959,48.251 156.362,47.848 160.812,47.848 161.538,48.574 178.068,48.574 179.7,50.206 196.306,50.206 197.954,48.559 197.954,46.885 199.153,45.686 199.5,45.686 200.653,45.686 200.787,45.551 200.787,43.83 201.04,43.578 201.476,43.578 201.728,43.83 201.728,45.826 201.862,45.961 202.131,45.961 202.265,45.826 202.265,43.83 202.518,43.578 202.954,43.578 203.206,43.83 203.206,45.826 203.34,45.961 203.609,45.961 203.743,45.826 203.743,43.83 203.996,43.578 204.432,43.578 204.684,43.83 204.684,45.826 204.818,45.961 205.087,45.961 205.221,45.826 205.221,43.83 205.474,43.578 205.91,43.578 206.162,43.83 206.162,45.826 206.296,45.961 206.565,45.961 206.699,45.826 206.699,43.83 206.952,43.578 207.388,43.578 207.64,43.83 207.64,45.826 207.774,45.961 208.043,45.961 208.177,45.826 208.177,43.83 208.43,43.578 208.866,43.578 209.118,43.83 209.118,45.826 209.252,45.961 209.521,45.961 209.655,45.826 209.655,43.83 209.908,43.578 210.344,43.578 210.596,43.83 210.596,45.826 210.73,45.961 210.999,45.961 211.133,45.826 211.133,43.83 211.386,43.578 211.822,43.578 212.074,43.83 212.074,45.826 212.208,45.961 212.477,45.961 212.611,45.826 212.611,43.83 212.864,43.578 213.3,43.578 213.552,43.83 213.552,45.551 213.686,45.686 213.783,45.686 214.021,45.686 214.201,45.506 214.201,43.296 214.096,43.192 204.526,43.192 204.299,42.964 204.299,42.549 J29.I8@203.7,41.95
SLOT8.LVDS_3_P: IC4.L32 J29.H8 | length 119.1
  TopLayer w0.095: IC4.L32@156.061,50.95 v1(156.561,51.45)
  Layer 3 w0.075: v1(156.561,51.45) 156.561,51.805 156.517,51.849 156.257,51.849 156.161,51.753 156.161,48.335 156.203,48.292 156.446,48.05 160.729,48.05 161.454,48.776 177.984,48.776 179.616,50.408 196.39,50.408 198.156,48.642 198.156,46.969 199.237,45.888 199.5,45.888 200.737,45.888 200.989,45.635 200.989,43.914 201.123,43.78 201.392,43.78 201.526,43.914 201.526,45.91 201.779,46.163 202.215,46.163 202.467,45.91 202.467,43.914 202.601,43.78 202.87,43.78 203.004,43.914 203.004,45.91 203.257,46.163 203.693,46.163 203.945,45.91 203.945,43.914 204.079,43.78 204.348,43.78 204.482,43.914 204.482,45.91 204.735,46.163 205.171,46.163 205.423,45.91 205.423,43.914 205.557,43.78 205.826,43.78 205.96,43.914 205.96,45.91 206.213,46.163 206.649,46.163 206.901,45.91 206.901,43.914 207.035,43.78 207.304,43.78 207.438,43.914 207.438,45.91 207.691,46.163 208.127,46.163 208.379,45.91 208.379,43.914 208.513,43.78 208.782,43.78 208.916,43.914 208.916,45.91 209.169,46.163 209.605,46.163 209.857,45.91 209.857,43.914 209.991,43.78 210.26,43.78 210.394,43.914 210.394,45.91 210.647,46.163 211.083,46.163 211.335,45.91 211.335,43.914 211.469,43.78 211.738,43.78 211.872,43.914 211.872,45.91 212.125,46.163 212.561,46.163 212.813,45.91 212.813,43.914 212.947,43.78 213.216,43.78 213.35,43.914 213.35,45.635 213.603,45.888 213.783,45.888 214.105,45.888 214.403,45.59 214.403,43.212 214.18,42.99 204.61,42.99 204.501,42.881 204.501,42.549 J29.H8@205.1,41.95
SLOT8.LVDS_4_N: IC4.J31 J29.L8 | length 117.4
  TopLayer w0.095: IC4.J31@155.061,52.95 v1(155.561,53.45)
  Layer 3 w0.075: v1(155.561,53.45) 155.561,53.095 155.517,53.051 155.224,53.051 154.959,52.786 154.959,47.251 155.36,46.85 160.887,46.85 161.067,46.85 161.345,47.128 161.345,47.346 161.504,47.505 161.823,47.505 161.982,47.346 161.982,46.724 162.259,46.447 162.745,46.447 163.023,46.724 163.023,47.838 163.182,47.997 163.501,47.997 163.66,47.838 163.66,46.724 163.937,46.447 164.423,46.447 164.701,46.724 164.701,47.838 164.86,47.997 165.179,47.997 165.338,47.838 165.338,46.724 165.615,46.447 166.101,46.447 166.379,46.724 166.379,47.838 166.538,47.997 166.857,47.997 167.016,47.838 167.016,46.724 167.293,46.447 167.779,46.447 168.057,46.724 168.057,47.838 168.216,47.997 168.535,47.997 168.694,47.838 168.694,46.724 168.971,46.447 169.457,46.447 169.735,46.724 169.735,47.838 169.894,47.997 170.213,47.997 170.372,47.838 170.372,46.724 170.649,46.447 171.135,46.447 171.413,46.724 171.413,47.838 171.572,47.997 171.891,47.997 172.05,47.838 172.05,46.724 172.327,46.447 172.813,46.447 173.091,46.724 173.091,47.838 173.25,47.997 173.569,47.997 173.728,47.838 173.728,46.724 174.005,46.447 174.491,46.447 174.769,46.724 174.769,47.838 174.928,47.997 175.247,47.997 175.406,47.838 175.406,46.724 175.683,46.447 176.169,46.447 176.447,46.724 176.447,47.838 176.606,47.997 176.925,47.997 177.084,47.838 177.084,46.724 177.361,46.447 177.847,46.447 178.125,46.724 178.125,47.838 178.284,47.997 178.603,47.997 178.762,47.838 178.762,46.724 179.039,46.447 179.525,46.447 179.803,46.724 179.803,49.275 179.962,49.434 180.281,49.434 180.44,49.275 180.44,47.128 180.717,46.85 181.126,46.85 182.079,46.85 182.432,47.203 182.56,47.331 182.56,47.723 182.218,48.066 182.218,48.291 182.443,48.516 182.668,48.516 184.501,46.683 184.893,46.683 185.237,47.027 185.237,47.419 184.055,48.601 184.055,48.826 184.679,49.45 184.791,49.45 184.972,49.45 185.131,49.291 185.131,48.242 185.408,47.964 185.894,47.964 186.172,48.242 186.172,49.47 186.331,49.629 186.65,49.629 186.809,49.47 186.809,47.999 187.086,47.722 187.572,47.722 187.85,47.999 187.85,49.47 188.009,49.629 188.328,49.629 188.487,49.47 188.487,47.999 188.764,47.722 189.25,47.722 189.528,47.999 189.528,49.47 189.687,49.629 190.006,49.629 190.165,49.47 190.165,47.999 190.442,47.722 190.928,47.722 191.206,47.999 191.206,49.47 191.365,49.629 191.684,49.629 191.843,49.47 191.843,47.999 192.12,47.722 192.606,47.722 192.884,47.999 192.884,49.47 193.043,49.629 193.362,49.629 193.521,49.47 193.521,47.999 193.798,47.722 194.284,47.722 194.562,47.999 194.562,49.291 194.721,49.45 194.818,49.45 195.091,49.45 197.057,47.483 197.057,46.966 199.112,44.91 199.63,44.91 200.099,44.442 200.099,44.42 200.099,44.049 199.94,43.89 199.13,43.89 198.852,43.612 198.852,43.126 199.13,42.849 199.94,42.849 200.099,42.69 200.099,42.593 200.099,42.311 199.738,41.95 J29.L8@199.5,41.95